# Altium PCB 24V-10A-Power-Board-v1.0.PcbDoc (part 2 of 5)
Units mil, origin at the board's own origin, x right, y up, seen from the top; angles counter-clockwise.
Board outline 6000 x 4000 mil, 2 copper layers (Top Layer, Bottom Layer); 609 components, 307 nets, 1491 pads, 0 vias.
Unrouted connection lines stored in the file: 1132.
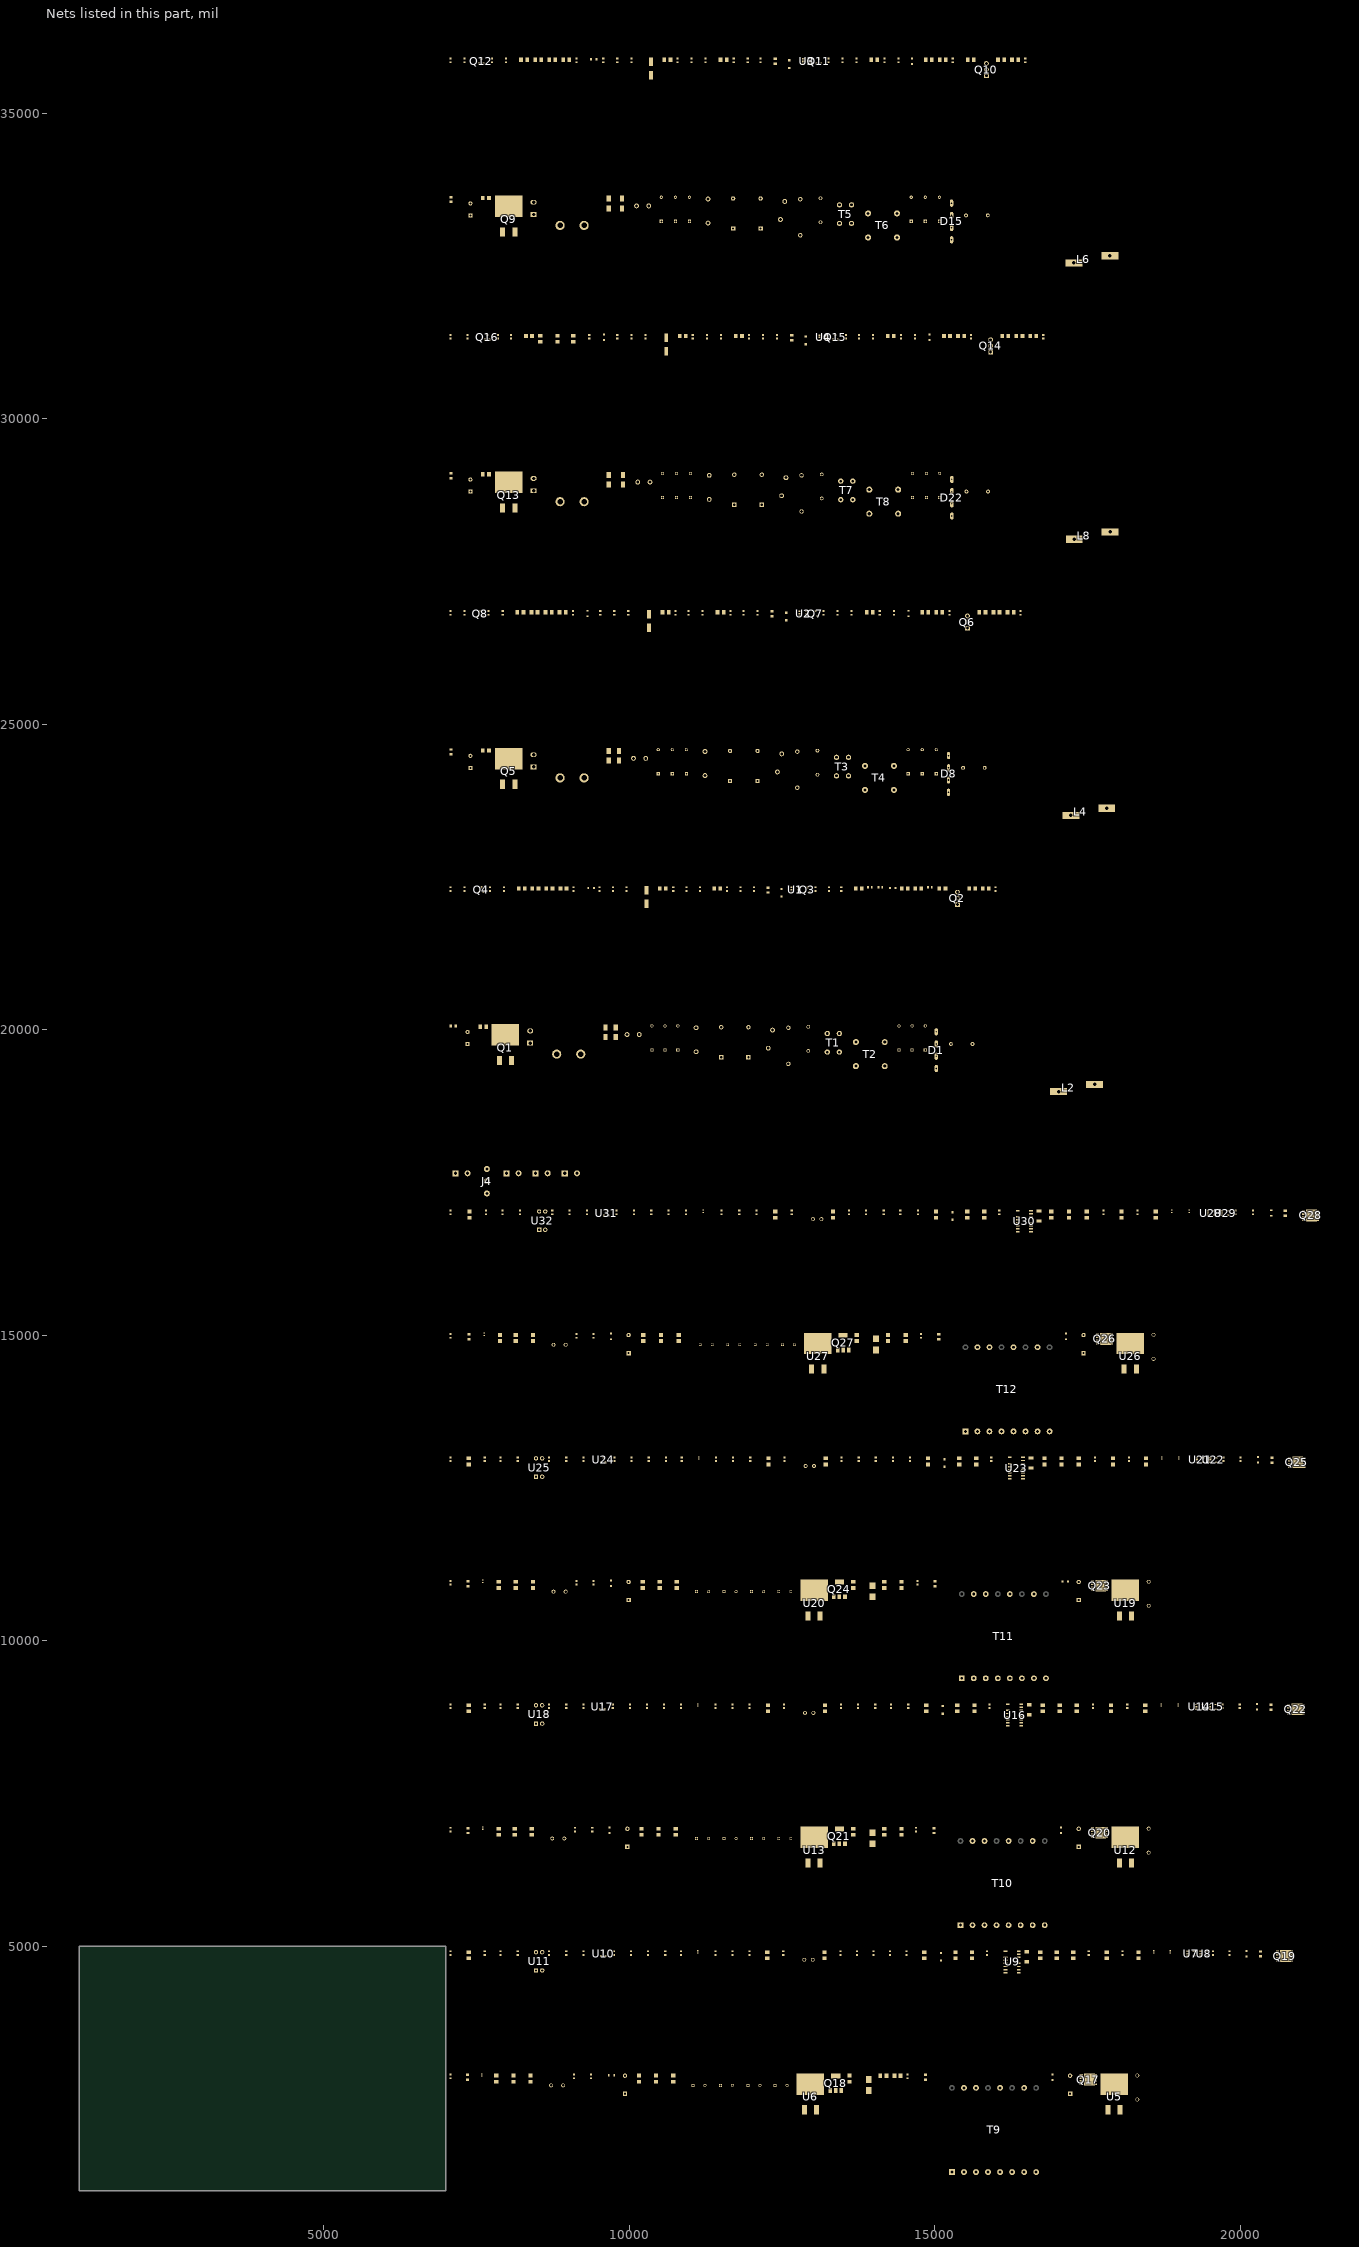
[diagram p2: the nets of this part, all layers, seen from the top]

## Part data (continued)
C15 C38 C61 C84: library part CC0603KRX7R8BB392, "CAP CER 3900PF 25V X7R 0603", Case Code (Imperial)=0603, Case Code (Metric)=1608, Dielectric=X7R, LCSC Part Number=C519424, Manufacturer=Yageo, Max Operating Temperature=125°C, Min Operating Temperature=-55°C, Tolerance=10%, Voltage Rating=25V, Case/Package=0603, ComponentLink1Description=https://datasheet.ciiva.com/13207/upy-gphc-x7r-6-3v-to-50v-8-12304-13207771.pdf?src-supplier=Mouser, ComponentLink1URL=https://datasheet.ciiva.com/13207/upy-gphc-x7r-6-3v-to-50v-8-12304-13207771.pdf?src-supplier=Mouser, Halogen Free="Halogen Free", Height=900um, Item Type=Capacitor, Lead Free="Lead Free", Length=0.063inch, Manufacturer Part Number=CC0603KRX7R8BB392, Material=4241ConductorMaterial, Mounting Technology="Surface Mount", Packaging="Tape and Reel", Pricing="1=0.1, 10=0.061, 50=0.035, 100=0.0271, 500=0.02036, 1000=0.016 (USD)", RoHS=Yes, Series=CC, Stock=46115, Supplier=Digikey, Termination=SMD/SMT, Thickness=0.035inch, Voltage Rating (DC)=25V, Weight=7.1E-05oz, Width=0.031inch
C16 C39 C62 C85: library part 06035A561JAT2A, "CAP CER 560PF 50V C0G/NP0 0603", LCSC Part Number=C597173, Manufacturer="Kyocera AVX", ComponentLink1Description=https://datasheet.ciiva.com/27051/1032160-27051276.pdf?src-supplier=Jameco, ComponentLink1URL=https://datasheet.ciiva.com/27051/1032160-27051276.pdf?src-supplier=Jameco, ComponentLink2Description=https://datasheet.ciiva.com/16286/ccog-16286446.pdf?src-supplier=Future+Electronics, ComponentLink2URL=https://datasheet.ciiva.com/16286/ccog-16286446.pdf?src-supplier=Future+Electronics, ComponentLink3Description=https://datasheet.ciiva.com/150/ccog-150647.pdf?src-supplier=Digikey, ComponentLink3URL=https://datasheet.ciiva.com/150/ccog-150647.pdf?src-supplier=Digikey, ComponentLink4Description=https://datasheet.ciiva.com/150/ccog-150648.pdf?src-supplier=Digikey, ComponentLink4URL=https://datasheet.ciiva.com/150/ccog-150648.pdf?src-supplier=Digikey, ComponentLink5Description=https://datasheet.ciiva.com/150/ccog-150649.pdf?src-supplier=Digikey, ComponentLink5URL=https://datasheet.ciiva.com/150/ccog-150649.pdf?src-supplier=Digikey, ComponentLink6Description=https://datasheet.ciiva.com/2987/ccog-2987809.pdf?src-supplier=Avnet, ComponentLink6URL=https://datasheet.ciiva.com/2987/ccog-2987809.pdf?src-supplier=Avnet, ComponentLink7Description=https://datasheet.ciiva.com/2987/ccog-2987810.pdf?src-supplier=Avnet, ComponentLink7URL=https://datasheet.ciiva.com/2987/ccog-2987810.pdf?src-supplier=Avnet, ComponentLink8Description=https://datasheet.ciiva.com/5423/ccog-5423589.pdf?src-supplier=Mouser, ComponentLink8URL=https://datasheet.ciiva.com/5423/ccog-5423589.pdf?src-supplier=Mouser, ComponentLink9Description=https://datasheet.ciiva.com/14598/70001039-14598549.pdf?src-supplier=Allied+Electronics, ComponentLink9URL=https://datasheet.ciiva.com/14598/70001039-14598549.pdf?src-supplier=Allied+Electronics, ComponentLink10Description=https://datasheet.ciiva.com/1124/425357-1124836.pdf?src-supplier=Element14, ComponentLink10URL=https://datasheet.ciiva.com/1124/425357-1124836.pdf?src-supplier=Element14, ComponentLink11Description=https://datasheet.ciiva.com/1124/425357-1124837.pdf?src-supplier=Element14, ComponentLink11URL=https://datasheet.ciiva.com/1124/425357-1124837.pdf?src-supplier=Element14, Item Type=Capacitor, Manufacturer Part Number=06035A561JAT2A, Pricing="4000=0.0172, 16000=0.0165, 40000=0.0091, 60000=0.0158, 100000=0.0088, 120000=0.0155, 160000=0.0083, 300000=0.0148 (USD)", RoHS=Yes, Stock=180000, Supplier="Future Electronics"
C17 C40 C63 C86: library part 12063C474KAT2A, "CAP CER 0.47UF 25V X7R 1206", LCSC Part Number=C5128353, Manufacturer="Kyocera AVX", ComponentLink1Description=https://datasheet.ciiva.com/11788/0900766b80dc2409-11788602.pdf?src-supplier=Rs, ComponentLink1URL=https://datasheet.ciiva.com/11788/0900766b80dc2409-11788602.pdf?src-supplier=Rs, ComponentLink2Description=https://datasheet.ciiva.com/19476/2014158-19476160.pdf?src-supplier=Jameco, ComponentLink2URL=https://datasheet.ciiva.com/19476/2014158-19476160.pdf?src-supplier=Jameco, ComponentLink3Description=https://datasheet.ciiva.com/14601/70001075-14601957.pdf?src-supplier=Allied+Electronics, ComponentLink3URL=https://datasheet.ciiva.com/14601/70001075-14601957.pdf?src-supplier=Allied+Electronics, ComponentLink4Description=https://datasheet.ciiva.com/28546/683218-28546839.pdf?src-supplier=Element14, ComponentLink4URL=https://datasheet.ciiva.com/28546/683218-28546839.pdf?src-supplier=Element14, ComponentLink5Description=https://datasheet.ciiva.com/7833/84526-7833365.pdf?src-supplier=Element14, ComponentLink5URL=https://datasheet.ciiva.com/7833/84526-7833365.pdf?src-supplier=Element14, ComponentLink6Description=https://datasheet.ciiva.com/16291/cx7r-16291039.pdf?src-supplier=Future+Electronics, ComponentLink6URL=https://datasheet.ciiva.com/16291/cx7r-16291039.pdf?src-supplier=Future+Electronics, ComponentLink7Description=https://datasheet.ciiva.com/152/cx7r-152592.pdf?src-supplier=Digikey, ComponentLink7URL=https://datasheet.ciiva.com/152/cx7r-152592.pdf?src-supplier=Digikey, ComponentLink8Description=https://datasheet.ciiva.com/152/cx7r-152593.pdf?src-supplier=Digikey, ComponentLink8URL=https://datasheet.ciiva.com/152/cx7r-152593.pdf?src-supplier=Digikey, ComponentLink9Description=https://datasheet.ciiva.com/152/cx7r-152594.pdf?src-supplier=Digikey, ComponentLink9URL=https://datasheet.ciiva.com/152/cx7r-152594.pdf?src-supplier=Digikey, Item Type=Capacitor, Manufacturer Part Number=12063C474KAT2A, Pricing="2000=0.0614, 6000=0.0591, 10000=0.0566, 20000=0.0567, 40000=0.0554, 80000=0.053 (USD)", RoHS=Yes, Stock=38000, Supplier="Future Electronics"
C18 C41 C64 C87: library part CC0603KRX7R9BB683, "CAP CER 0.068UF 50V X7R 0603", Case Code (Imperial)=0603, Case Code (Metric)=1608, Dielectric=X7R, LCSC Part Number=C107098, Manufacturer=Yageo, Max Operating Temperature=125°C, Min Operating Temperature=-55°C, Supplier Part Number=3015344, Tolerance=10%, Voltage Rating=50V, Case/Package=0603, ComponentLink1Description=http://www.mouser.com/ds/2/447/Yageo_UPY-GP_NP0_16V-to-50V_9-358835.pdf?src-supplier=Mouser, ComponentLink1URL=http://www.mouser.com/ds/2/447/Yageo_UPY-GP_NP0_16V-to-50V_9-358835.pdf?src-supplier=Mouser, ComponentLink2Description=https://datasheet.octopart.com/CC0603KRX7R9BB683-Yageo-datasheet-166511530.pdf?src-supplier=Future+Electronics, ComponentLink2URL=https://datasheet.octopart.com/CC0603KRX7R9BB683-Yageo-datasheet-166511530.pdf?src-supplier=Future+Electronics, ComponentLink3Description=http://www.yageo.com/documents/recent/UPY-GPHC_X7R_6.3V-to-50V_18.pdf?src-supplier=Digikey, ComponentLink3URL=http://www.yageo.com/documents/recent/UPY-GPHC_X7R_6.3V-to-50V_18.pdf?src-supplier=Digikey, ComponentLink4Description=https://www.yageo.com/upload/media/product/productsearch/datasheet/mlcc/UPY-GPHC_X7R_6.3V-to-50V_18.pdf?src-supplier=Digikey, ComponentLink4URL=https://www.yageo.com/upload/media/product/productsearch/datasheet/mlcc/UPY-GPHC_X7R_6.3V-to-50V_18.pdf?src-supplier=Digikey, ComponentLink5Description=https://datasheet.octopart.com/CC0603KRX7R9BB683-Yageo-datasheet-140260305.pdf?src-supplier=Newark, ComponentLink5URL=https://datasheet.octopart.com/CC0603KRX7R9BB683-Yageo-datasheet-140260305.pdf?src-supplier=Newark, ComponentLink6Description=http://www.yageo.com/documents/recent/UPY-GPHC_X7R_6.3V-to-50V_9.pdf?src-supplier=Future+Electronics, ComponentLink6URL=http://www.yageo.com/documents/recent/UPY-GPHC_X7R_6.3V-to-50V_9.pdf?src-supplier=Future+Electronics, Halogen Free="Halogen Free", Item Type=Capacitors, Lead Free="Lead Free", Length=0.063inch, Manufacturer Part Number=CC0603KRX7R9BB683, Material=4241ConductorMaterial, Mounting Technology="Surface Mount", Packaging="Tape and Reel", Pricing="4000=0.0058, 16000=0.0055, 60000=0.0052, 160000=0.005, 400000=0.0047 (USD)", RoHS=Yes, RoHS Compliant=Yes, Series=CC, Stock=52000, Supplier="Future Electronics", Termination=SMD/SMT, Thickness=0.035inch, Voltage Rating (DC)=50V, Weight=7.1E-05oz, Width=0.031inch
C19 C42 C65 C88: library part CC0603KRX7R7BB224, "CAP CER 0.22UF 16V X7R 0603", Manufacturer=Yageo, Supplier Part Number=311-1426-1-ND, Voltage Rating (DC)=16V, ComponentLink1Description=https://datasheet.ciiva.com/11788/0900766b80d84f1d-11788400.pdf?src-supplier=Rs, ComponentLink1URL=https://datasheet.ciiva.com/11788/0900766b80d84f1d-11788400.pdf?src-supplier=Rs, ComponentLink2Description=https://datasheet.ciiva.com/176/mlccorderingcode-176606.pdf?src-supplier=Digikey, ComponentLink2URL=https://datasheet.ciiva.com/176/mlccorderingcode-176606.pdf?src-supplier=Digikey, ComponentLink3Description=https://datasheet.ciiva.com/176/mlccorderingcode-176607.pdf?src-supplier=Digikey, ComponentLink3URL=https://datasheet.ciiva.com/176/mlccorderingcode-176607.pdf?src-supplier=Digikey, ComponentLink4Description=https://datasheet.ciiva.com/176/mlccorderingcode-176608.pdf?src-supplier=Digikey, ComponentLink4URL=https://datasheet.ciiva.com/176/mlccorderingcode-176608.pdf?src-supplier=Digikey, Halogen Free=5694HalogenFree, Item Type=Capacitor, Lead Free=5697LeadFree, Manufacturer Part Number=CC0603KRX7R7BB224, Material=4241ConductorMaterial, Pricing="1=0.1, 10=0.058, 50=0.0334, 100=0.0258, 500=0.01944, 1000=0.01528 (USD)", RoHS=Yes, Stock=45192, Supplier=Digikey
C20 C43 C66 C89: library part CC1206KKX7R9BB474, "CAP CER 0.47UF 50V X7R 1206", LCSC Part Number=C277483, Manufacturer=Yageo, ComponentLink1Description=https://datasheet.ciiva.com/13210/upy-gp-np0-16v-to-50v-8-13210236.pdf?src-supplier=Mouser, ComponentLink1URL=https://datasheet.ciiva.com/13210/upy-gp-np0-16v-to-50v-8-13210236.pdf?src-supplier=Mouser, ComponentLink2Description=https://datasheet.ciiva.com/181/mlccorderingcode-181013.pdf?src-supplier=Digikey, ComponentLink2URL=https://datasheet.ciiva.com/181/mlccorderingcode-181013.pdf?src-supplier=Digikey, ComponentLink3Description=https://datasheet.ciiva.com/181/mlccorderingcode-181014.pdf?src-supplier=Digikey, ComponentLink3URL=https://datasheet.ciiva.com/181/mlccorderingcode-181014.pdf?src-supplier=Digikey, ComponentLink4Description=https://datasheet.ciiva.com/181/mlccorderingcode-181015.pdf?src-supplier=Digikey, ComponentLink4URL=https://datasheet.ciiva.com/181/mlccorderingcode-181015.pdf?src-supplier=Digikey, Item Type=Capacitor, Manufacturer Part Number=CC1206KKX7R9BB474, Material=4241ConductorMaterial, Pricing="3000=0.0393, 9000=0.0378, 15000=0.0371, 30000=0.0362, 60000=0.0349 (USD)", RoHS=Yes, Stock=36000, Supplier="Future Electronics"
C21 C44 C67 C90: library part 50SVPF10M, "CAP ALUM POLY 10UF 20% 50V SMD", LCSC Part Number=C2162323, Manufacturer=Panasonic, Supplier Part Number=667-50SVPF10M, Category="Polymer Capacitors", ComponentLink1Description=https://datasheet.ciiva.com/48542/svpf-eng-ds-48542427.pdf?src-supplier=Distrelec, ComponentLink1URL=https://datasheet.ciiva.com/48542/svpf-eng-ds-48542427.pdf?src-supplier=Distrelec, ComponentLink2Description=https://datasheet.ciiva.com/24216/svpf-os-262415-24216043.pdf?src-supplier=Mouser, ComponentLink2URL=https://datasheet.ciiva.com/24216/svpf-os-262415-24216043.pdf?src-supplier=Mouser, ComponentLink3Description=https://datasheet.ciiva.com/25761/1734360-25761263.pdf?src-supplier=Farnell, ComponentLink3URL=https://datasheet.ciiva.com/25761/1734360-25761263.pdf?src-supplier=Farnell, Item Type=Capacitor, Manufacturer Part Number=50SVPF10M, Material=4242ConductorMaterial, Pricing="1=1.12, 10=0.801, 50=0.801, 100=0.665, 1000=0.555, 10000=0.504 (USD)", RoHS=Yes, Stock=29802, Supplier=Mouser
C22 C45 C68 C91: "CAP CER 1000PF 100V X7R 0603", LCSC Part Number=C2167292, Manufacturer="Kyocera AVX", ComponentLink1Description=https://datasheet.ciiva.com/5422/cx7r-218113-5422905.pdf?src-supplier=Mouser, ComponentLink1URL=https://datasheet.ciiva.com/5422/cx7r-218113-5422905.pdf?src-supplier=Mouser, ComponentLink2Description=https://datasheet.ciiva.com/11499/cx7r-11499669.pdf?src-supplier=Avnet, ComponentLink2URL=https://datasheet.ciiva.com/11499/cx7r-11499669.pdf?src-supplier=Avnet, ComponentLink3Description=https://datasheet.ciiva.com/2987/cx7r-2987733.pdf?src-supplier=Avnet, ComponentLink3URL=https://datasheet.ciiva.com/2987/cx7r-2987733.pdf?src-supplier=Avnet, ComponentLink4Description=https://datasheet.ciiva.com/150/cx7r-150395.pdf?src-supplier=Digikey, ComponentLink4URL=https://datasheet.ciiva.com/150/cx7r-150395.pdf?src-supplier=Digikey, ComponentLink5Description=https://datasheet.ciiva.com/150/cx7r-150396.pdf?src-supplier=Digikey, ComponentLink5URL=https://datasheet.ciiva.com/150/cx7r-150396.pdf?src-supplier=Digikey, ComponentLink6Description=https://datasheet.ciiva.com/150/cx7r-150397.pdf?src-supplier=Digikey, ComponentLink6URL=https://datasheet.ciiva.com/150/cx7r-150397.pdf?src-supplier=Digikey, ComponentLink7Description=https://datasheet.ciiva.com/1124/1679506-1124198.pdf?src-supplier=Element14, ComponentLink7URL=https://datasheet.ciiva.com/1124/1679506-1124198.pdf?src-supplier=Element14, ComponentLink8Description=https://datasheet.ciiva.com/22693/1679506-22693579.pdf?src-supplier=Element14, ComponentLink8URL=https://datasheet.ciiva.com/22693/1679506-22693579.pdf?src-supplier=Element14, ComponentLink9Description=https://datasheet.ciiva.com/7855/1679506-7855033.pdf?src-supplier=Element14, ComponentLink9URL=https://datasheet.ciiva.com/7855/1679506-7855033.pdf?src-supplier=Element14, ComponentLink10Description=https://datasheet.ciiva.com/7855/84526-7855189.pdf?src-supplier=Element14, ComponentLink10URL=https://datasheet.ciiva.com/7855/84526-7855189.pdf?src-supplier=Element14, ComponentLink11Description=https://datasheet.ciiva.com/16289/cx7r-16289400.pdf?src-supplier=Future+Electronics, ComponentLink11URL=https://datasheet.ciiva.com/16289/cx7r-16289400.pdf?src-supplier=Future+Electronics, ComponentLink12Description=https://datasheet.ciiva.com/14594/70001075-14594623.pdf?src-supplier=Allied+Electronics, ComponentLink12URL=https://datasheet.ciiva.com/14594/70001075-14594623.pdf?src-supplier=Allied+Electronics, ComponentLink13Description=https://datasheet.ciiva.com/14600/70001075-14600988.pdf?src-supplier=Allied+Electronics, ComponentLink13URL=https://datasheet.ciiva.com/14600/70001075-14600988.pdf?src-supplier=Allied+Electronics, Item Type=Capacitor, Lead Free=5697LeadFree, Manufacturer Part Number=06031C102KAT2A, Pricing="4000=0.0086, 8000=0.0084, 16000=0.0082, 24000=0.008, 32000=0.0079 (USD)", RoHS=Yes, Stock=656000, Supplier=Avnet
C23 C46 C69 C92: library part 06035A100JAT2A, "CAP CER 10PF 50V C0G/NP0 0603", Case/Package=0603, Dielectric=C0G, Insulation Resistance=100GR, LCSC Part Number=C79547, Manufacturer="Kyocera AVX", Manufacturer Part Number=06035A100JAT2A/4K, Max Operating Temperature=125°C, Min Operating Temperature=-55°C, Supplier Part Number 1=478-1163-1-ND, Temperature Coefficient=30ppm/°C, Tolerance=5%, Voltage=50V, Capacitance=10pF, Depth=0.81mm, Height=0.9mm, Item Type=Capacitor, Lead Free="Lead Free", Length=1.6mm, Mount="Surface Mount", Number of Pins=2, Packaging="Cut Tape", Pricing 1="1=0.1, 10=0.05, 50=0.0272, 100=0.0222, 500=0.01586, 1000=0.01246 (USD)", REACH SVHC="No SVHC", Stock 1=196463, Supplier 1=Digi-Key, Thickness=864um, Voltage Rating (DC)=50V, Width=810um
C93 C128 C163 C198: library part DE1E3RA222MA4BN01F, "2200 pF ±20% 250VAC Ceramic Capacitor E Radial, Disc", LCSC Part Number=C343981, Manufacturer=Murata, ComponentLink1Description=http://www.farnell.com/datasheets/2608335.pdf?src-supplier=Farnell, ComponentLink1URL=http://www.farnell.com/datasheets/2608335.pdf?src-supplier=Farnell, ComponentLink2Description=http://www.farnell.com/datasheets/2608335.pdf?src-supplier=Newark, ComponentLink2URL=http://www.farnell.com/datasheets/2608335.pdf?src-supplier=Newark, ComponentLink3Description=https://datasheet.octopart.com/DE1E3RA222MA4BN01F-Murata-datasheet-166166226.pdf?src-supplier=TME, ComponentLink3URL=https://datasheet.octopart.com/DE1E3RA222MA4BN01F-Murata-datasheet-166166226.pdf?src-supplier=TME, Item Type=Capacitors, Manufacturer Part Number=DE1E3RA222MA4BN01F, Pricing="1=0.42, 10=0.271, 50=0.271, 100=0.146, 1000=0.114, 10000=0.097 (USD)", RoHS=Yes, Stock=37677, Supplier=Mouser
C94 C102 C129 C137 C164 C172 C199 C207: "22nF -40℃~+100℃ ±5% 630V Plugin,P=7.5mm Polypropylene Film Capacitors (CBB) ROHS", LCSC Part Number=C390073, Manufacturer=KYET, Package=Plugin,P=7.5mm, ComponentLink1Description=LCSC, ComponentLink1URL=https://www.lcsc.com/product-detail/Polypropylene-Film-Capacitors-CBB_KYET-KP223J2J0701_C390073.html, Item Type=Capacitor, Manufacturer Part Number=KP223J2J0701
C95 C96 C107 C108 C130 C131 C142 C143 C165 C166 C177 C178 C200 C201 C212 C213: library part UMK316AB7475KL-T, "CAP CER 4.7UF 50V X7R 1206", Case Code (Imperial)=1206, Case Code (Metric)=3216, Dielectric=X7R, LCSC Part Number=C92853, Manufacturer="Taiyo Yuden", Max Operating Temperature=125°C, Min Operating Temperature=-55°C, Package Quantity=2000, Tolerance=10%, Voltage Rating=50V, Case/Package=1206, ComponentLink1Description=https://datasheet.ciiva.com/170/umk316ab7475kl-t-ss-170928.pdf?src-supplier=Digikey, ComponentLink1URL=https://datasheet.ciiva.com/170/umk316ab7475kl-t-ss-170928.pdf?src-supplier=Digikey, ComponentLink2Description=https://datasheet.ciiva.com/2990/umk316ab7475kl-t-ss-2990070.pdf?src-supplier=Avnet, ComponentLink2URL=https://datasheet.ciiva.com/2990/umk316ab7475kl-t-ss-2990070.pdf?src-supplier=Avnet, ComponentLink3Description=https://datasheet.ciiva.com/15922/1010umk316ab7475kl-t-15922628.pdf?src-supplier=Onlinecomponents.com, ComponentLink3URL=https://datasheet.ciiva.com/15922/1010umk316ab7475kl-t-15922628.pdf?src-supplier=Onlinecomponents.com, ComponentLink4Description=https://datasheet.ciiva.com/7975/1481447-7975911.pdf?src-supplier=Element14, ComponentLink4URL=https://datasheet.ciiva.com/7975/1481447-7975911.pdf?src-supplier=Element14, ComponentLink5Description=https://datasheet.ciiva.com/5413/mlcc-all-e-541559-5413006.pdf?src-supplier=Mouser, ComponentLink5URL=https://datasheet.ciiva.com/5413/mlcc-all-e-541559-5413006.pdf?src-supplier=Mouser, Construction=Flat, Depth=1.6mm, Height=1.6mm, Item Type=Capacitor, Length=3.2mm, Manufacturer Part Number=UMK316AB7475KL-T, Mounting Technology="Surface Mount", Packaging="Tape and Reel", Pins=2, Pricing="1=0.3, 10=0.198, 50=0.146, 100=0.1189, 500=0.09386, 1000=0.07925 (USD)", Radiation Hardening=No, Reach SVHC Compliant=Unknown, RoHS=Yes, RoHS Compliant=Yes, Series=M, Stock=392550, Supplier=Digikey, Termination=SMD/SMT, Voltage Rating (DC)=50V, Width=1.6mm
C97 C98 C99 C100 C132 C133 C134 C135 C167 C168 C169 C170 C202 C203 C204 C205: library part EEU-FR1V681B, "CAP ALUM 680UF 20% 35V RADIAL TH", Case/Package=Radial, ESR (Equivalent Series Resistance)=20mR, LCSC Part Number=C178718, Manufacturer=Panasonic, Max Operating Temperature=105°C, Min Operating Temperature=-40°C, Package Quantity=500, Ripple Current=2.18A, Tolerance=20%, Voltage Rating=35V, ComponentLink1Description=https://datasheet.ciiva.com/11677/aba0000ce132-11677705.pdf?src-supplier=Avnet, ComponentLink1URL=https://datasheet.ciiva.com/11677/aba0000ce132-11677705.pdf?src-supplier=Avnet, ComponentLink2Description=https://datasheet.ciiva.com/15941/aba0000ce132-15941222.pdf?src-supplier=Onlinecomponents.com, ComponentLink2URL=https://datasheet.ciiva.com/15941/aba0000ce132-15941222.pdf?src-supplier=Onlinecomponents.com, ComponentLink3Description=https://datasheet.ciiva.com/43469/1653413-43469593.pdf?src-supplier=Farnell, ComponentLink3URL=https://datasheet.ciiva.com/43469/1653413-43469593.pdf?src-supplier=Farnell, ComponentLink4Description=https://datasheet.ciiva.com/46371/1653413-46371786.pdf?src-supplier=Element14, ComponentLink4URL=https://datasheet.ciiva.com/46371/1653413-46371786.pdf?src-supplier=Element14, ComponentLink5Description=https://datasheet.ciiva.com/29248/448590-da-01-en-alu-kondensator-fr-r-680-uf-35v-500st-29248054.pdf?src-supplier=Conrad, ComponentLink5URL=https://datasheet.ciiva.com/29248/448590-da-01-en-alu-kondensator-fr-r-680-uf-35v-500st-29248054.pdf?src-supplier=Conrad, Diameter=10mm, Features="General Purpose", Height=20mm, Height - Seated (Max)=0.866inch, Impedance=20mR, Item Type=Capacitor, Lead Diameter=0.6mm, Lead Pitch=5mm, Lead/Base Style=Straight, Length=20mm, Life (Hours)=10000Hour, Manufacturer Part Number=EEU-FR1V681B, Mounting Technology="Through Hole", Packaging="Tape and Reel", Pricing="1=0.93, 10=0.674, 50=0.5894, 100=0.4803 (USD)", Radiation Hardening=No, Reach SVHC Compliant=Yes, RoHS=Yes, RoHS Compliant=Yes, Series=FR, Stock=566, Supplier=Digikey, Termination=Radial, Voltage Rating (DC)=35V
C101 C110 C112 C136 C145 C147 C171 C180 C182 C206 C215 C217: library part CC1206KRX7R9BB104, "CAP CER 0.1UF 50V X7R 1206", Case Code (Imperial)=1206, Case Code (Metric)=3216, Dielectric=X7R, Insulation Resistance=100GR, LCSC Part Number=311-1179-1-ND, Manufacturer=Yageo, Max Operating Temperature=125°C, Min Operating Temperature=-55°C, Tolerance=10%, Voltage=50V, Case/Package=1206, ComponentLink1Description=https://datasheet.ciiva.com/11786/0900766b80d84f1d-11786968.pdf?src-supplier=Rs, ComponentLink1URL=https://datasheet.ciiva.com/11786/0900766b80d84f1d-11786968.pdf?src-supplier=Rs, ComponentLink2Description=https://datasheet.ciiva.com/7978/1489800-7978230.pdf?src-supplier=Element14, ComponentLink2URL=https://datasheet.ciiva.com/7978/1489800-7978230.pdf?src-supplier=Element14, ComponentLink3Description=https://datasheet.ciiva.com/28450/1489800-28450892.pdf?src-supplier=Element14, ComponentLink3URL=https://datasheet.ciiva.com/28450/1489800-28450892.pdf?src-supplier=Element14, ComponentLink4Description=https://datasheet.ciiva.com/144/mlccorderingcode-144906.pdf?src-supplier=Digikey, ComponentLink4URL=https://datasheet.ciiva.com/144/mlccorderingcode-144906.pdf?src-supplier=Digikey, ComponentLink5Description=https://datasheet.ciiva.com/144/mlccorderingcode-144905.pdf?src-supplier=Digikey, ComponentLink5URL=https://datasheet.ciiva.com/144/mlccorderingcode-144905.pdf?src-supplier=Digikey, ComponentLink6Description=https://datasheet.ciiva.com/144/mlccorderingcode-144907.pdf?src-supplier=Digikey, ComponentLink6URL=https://datasheet.ciiva.com/144/mlccorderingcode-144907.pdf?src-supplier=Digikey, ComponentLink7Description=https://datasheet.ciiva.com/5425/upy-gp-np0-16v-to-50v-8-3714-5425561.pdf?src-supplier=Mouser, ComponentLink7URL=https://datasheet.ciiva.com/5425/upy-gp-np0-16v-to-50v-8-3714-5425561.pdf?src-supplier=Mouser, ComponentLink8Description=https://datasheet.ciiva.com/28363/1734573-28363672.pdf?src-supplier=Element14, ComponentLink8URL=https://datasheet.ciiva.com/28363/1734573-28363672.pdf?src-supplier=Element14, ComponentLink9Description=https://datasheet.ciiva.com/46385/1734573-46385063.pdf?src-supplier=Element14, ComponentLink9URL=https://datasheet.ciiva.com/46385/1734573-46385063.pdf?src-supplier=Element14, ComponentLink10Description=https://datasheet.ciiva.com/15189/getdatasheetpartid-251811-15189275.pdf?src-supplier=Verical, ComponentLink10URL=https://datasheet.ciiva.com/15189/getdatasheetpartid-251811-15189275.pdf?src-supplier=Verical, Depth=1.6mm, Halogen Free=5694HalogenFree, Height=0.85mm, Item Type=Capacitor, Lead Free=5697LeadFree, Length=3.2mm, Manufacturer Part Number=CC1206KRX7R9BB104, Material=Ceramic, Mounting Technology="Surface Mount", Packaging="Tape and Reel", Pins=2, Pricing="1=0.19, 10=0.128, 50=0.0764, 100=0.0601, 500=0.04436, 1000=0.03672 (USD)", Radiation Hardening=No, Reach SVHC Compliant=Unknown, RoHS=Yes, RoHS Compliant=Yes, Series=CC, Stock=520624, Supplier=Digikey, Termination=SMD/SMT, Voltage Rating=50V, Voltage Rating (DC)=50V
C103 C138 C173 C208: library part GRM31A5C2J151JW01D, "CAP CER 150PF 630V C0G/NP0 1206", LCSC Part Number=C162445, Manufacturer=Murata, ComponentLink1Description=https://datasheet.ciiva.com/138/partnumbering-e-01-138796.pdf?src-supplier=Digikey, ComponentLink1URL=https://datasheet.ciiva.com/138/partnumbering-e-01-138796.pdf?src-supplier=Digikey, ComponentLink2Description=https://datasheet.ciiva.com/138/partnumbering-e-01-138797.pdf?src-supplier=Digikey, ComponentLink2URL=https://datasheet.ciiva.com/138/partnumbering-e-01-138797.pdf?src-supplier=Digikey, ComponentLink3Description=https://datasheet.ciiva.com/138/partnumbering-e-01-138798.pdf?src-supplier=Digikey, ComponentLink3URL=https://datasheet.ciiva.com/138/partnumbering-e-01-138798.pdf?src-supplier=Digikey, ComponentLink4Description=https://datasheet.ciiva.com/13240/c02e-2905-13240518.pdf?src-supplier=Mouser, ComponentLink4URL=https://datasheet.ciiva.com/13240/c02e-2905-13240518.pdf?src-supplier=Mouser, Item Type=Capacitor, Manufacturer Part Number=GRM31A5C2J151JW01D, Pricing="1=0.35, 10=0.194, 50=0.194, 100=0.12, 1000=0.1, 10000=0.08 (USD)", RoHS=Yes, Stock=4361, Supplier=Mouser
C104 C139 C174 C209: library part GRM31A5C3A101JW01D, "CAP CER 100PF 1KV 5% NP0 1206", LCSC Part Number=C162451, Manufacturer=Murata, ComponentLink1Description=https://datasheet.ciiva.com/29535/partnumbering-e-01-29535608.pdf?src-supplier=Digikey, ComponentLink1URL=https://datasheet.ciiva.com/29535/partnumbering-e-01-29535608.pdf?src-supplier=Digikey, ComponentLink2Description=https://datasheet.ciiva.com/7829/1666664-7829029.pdf?src-supplier=Element14, ComponentLink2URL=https://datasheet.ciiva.com/7829/1666664-7829029.pdf?src-supplier=Element14, Item Type=Capacitor, Manufacturer Part Number=GRM31A5C3A101JW01D, Pricing="4000=0.0742, 8000=0.0723, 12000=0.0712, 16000=0.0704, 20000=0.068 (USD)", RoHS=Yes, Stock=4000, Supplier="Future Electronics"
C105 C140 C175 C210: library part EEU-FR1V471B, "CAP ALUM 470UF 20% 35V RADIAL", LCSC Part Number=C713403, Leakage Current=164.5uA, Manufacturer=Panasonic, ComponentLink1Description=https://datasheet.ciiva.com/43469/1653413-43469590.pdf?src-supplier=Farnell, ComponentLink1URL=https://datasheet.ciiva.com/43469/1653413-43469590.pdf?src-supplier=Farnell, ComponentLink2Description=https://datasheet.ciiva.com/11678/aba0000ce132-11678063.pdf?src-supplier=Avnet, ComponentLink2URL=https://datasheet.ciiva.com/11678/aba0000ce132-11678063.pdf?src-supplier=Avnet, ComponentLink3Description=https://datasheet.ciiva.com/46371/1653413-46371772.pdf?src-supplier=Element14, ComponentLink3URL=https://datasheet.ciiva.com/46371/1653413-46371772.pdf?src-supplier=Element14, ComponentLink4Description=https://datasheet.ciiva.com/7805/1725490-7805503.pdf?src-supplier=Element14, ComponentLink4URL=https://datasheet.ciiva.com/7805/1725490-7805503.pdf?src-supplier=Element14, ComponentLink5Description=https://datasheet.ciiva.com/30252/9aba0000ce132-30252342.pdf?src-supplier=Onlinecomponents.com, ComponentLink5URL=https://datasheet.ciiva.com/30252/9aba0000ce132-30252342.pdf?src-supplier=Onlinecomponents.com, ComponentLink6Description=https://datasheet.ciiva.com/16387/aba0000ce132-16387061.pdf?src-supplier=Future+Electronics, ComponentLink6URL=https://datasheet.ciiva.com/16387/aba0000ce132-16387061.pdf?src-supplier=Future+Electronics, ComponentLink7Description=https://datasheet.ciiva.com/14602/70257620-14602201.pdf?src-supplier=Allied+Electronics, ComponentLink7URL=https://datasheet.ciiva.com/14602/70257620-14602201.pdf?src-supplier=Allied+Electronics, ComponentLink8Description=https://datasheet.ciiva.com/29247/448536-da-01-en-alu-kondensator-fr-r-470-uf-35v-500st-29247995.pdf?src-supplier=Conrad, ComponentLink8URL=https://datasheet.ciiva.com/29247/448536-da-01-en-alu-kondensator-fr-r-470-uf-35v-500st-29247995.pdf?src-supplier=Conrad, Item Type=Capacitor, Lead Free=5697LeadFree, Manufacturer Part Number=EEU-FR1V471B, Pins=2NUMBER, Pricing="1=0.78, 10=0.461, 50=0.461, 100=0.375, 1000=0.263, 10000=0.23 (USD)", RoHS=Yes, Stock=21799, Supplier=Mouser
C106 C141 C176 C211: library part CC1206KKX5R9BB225, "CAP CER 2.2UF 50V X5R 1206", Case Code (Imperial)=1206, Case Code (Metric)=3216, Dielectric=X5R, LCSC Part Number=C577210, Manufacturer=Yageo, Max Operating Temperature=85°C, Min Operating Temperature=-55°C, Package Quantity=2000, Tolerance=10%, Voltage Rating=50V, Case/Package=1206, ComponentLink1Description=http://www.mouser.com/ds/2/447/Yageo_UPY-GP_NP0_16V-to-50V_9-358835.pdf?src-supplier=Mouser, ComponentLink1URL=http://www.mouser.com/ds/2/447/Yageo_UPY-GP_NP0_16V-to-50V_9-358835.pdf?src-supplier=Mouser, ComponentLink2Description=http://www.yageo.com/documents/recent/UPY-GPHC_X5R_4V-to-50V_25.pdf?src-supplier=Digikey, ComponentLink2URL=http://www.yageo.com/documents/recent/UPY-GPHC_X5R_4V-to-50V_25.pdf?src-supplier=Digikey, Halogen Free="Halogen Free", Height=1.45mm, Item Type=Capacitor, Lead Free="Lead Free", Length=0.126inch, Manufacturer Part Number=CC1206KKX5R9BB225, Material=4241ConductorMaterial, Mounting Technology="Surface Mount", Packaging="Tape and Reel", Pricing="1=0.59, 10=0.395, 50=0.3144, 100=0.2597, 500=0.20286, 1000=0.17244 (USD)", RoHS=Yes, RoHS Compliant=Yes, Series=CC, Stock=4588, Supplier=Digikey, Termination=SMD/SMT, Thickness=0.071inch, Voltage Rating (DC)=50V, Weight=0.000571oz, Width=0.063inch
C109 C111 C144 C146 C179 C181 C214 C216: library part CC0603KRX5R8BB225, "CAP CER 2.2UF 25V X5R 0603", Case Code (Imperial)=0603, Case Code (Metric)=1608, Dielectric=X5R, LCSC Part Number=C309478, Manufacturer=Yageo, Max Operating Temperature=85°C, Min Operating Temperature=-55°C, Package Quantity=4000, Resistor Type=Ceramic, Supplier Part Number 1=311-1786-1-ND, Tolerance=10%, Voltage Rating=25V, Capacitance=2.2uF, Case/Package=0603, ComponentLink1Description=https://www.verical.com/server-webapp/html/getDatasheet?partID=782757&src-supplier=Verical, ComponentLink1URL=https://www.verical.com/server-webapp/html/getDatasheet?partID=782757&src-supplier=Verical, Depth=0.8mm, Halogen Free="Halogen Free", Item Type=Capacitor, Lead Free="Lead Free", Length=1.6mm, Manufacturer Part Number=CC0603KRX5R8BB225, Mount="Surface Mount", Packaging="Tape and Reel", Pricing 1="1=0.4, 10=0.276, 50=0.1932, 100=0.1656, 500=0.1242, 1000=0.10488 (USD)", Radiation Hardening=No, RoHS Compliant=Yes, Stock 1=687936, Supplier 1=Digi-Key, Termination=SMD/SMT, Thickness=0.037inch, Voltage Rating (DC)=25V, Weight=7.1E-05oz, Width=0.031inch
C113 C148 C183 C218: library part CC1206KKX7R7BB225, "CAP CER 2.2UF 16V X7R 1206", LCSC Part Number=C107183, Manufacturer=Yageo, ComponentLink1Description=https://datasheet.ciiva.com/11788/0900766b80d84f1d-11788402.pdf?src-supplier=Rs, ComponentLink1URL=https://datasheet.ciiva.com/11788/0900766b80d84f1d-11788402.pdf?src-supplier=Rs, ComponentLink2Description=https://datasheet.ciiva.com/11466/upy-gphc-x7r-6-3v-to-50v-8-11466572.pdf?src-supplier=Avnet, ComponentLink2URL=https://datasheet.ciiva.com/11466/upy-gphc-x7r-6-3v-to-50v-8-11466572.pdf?src-supplier=Avnet, ComponentLink3Description=https://datasheet.ciiva.com/5425/upy-gphc-x7r-6-3v-to-50v-8-12304-5425499.pdf?src-supplier=Mouser, ComponentLink3URL=https://datasheet.ciiva.com/5425/upy-gphc-x7r-6-3v-to-50v-8-12304-5425499.pdf?src-supplier=Mouser, Item Type=Capacitors, Manufacturer Part Number=CC1206KKX7R7BB225, Material=4241ConductorMaterial, Pricing="1=0.22, 10=0.144, 50=0.1012, 100=0.0817, 500=0.06072, 1000=0.05312 (USD)", RoHS=Yes, Stock=202610, Supplier=Digikey
C114 C115 C116 C149 C150 C151 C184 C185 C186 C219 C220 C221: library part CC0603KRX5R7BB475, "CAP CER 4.7UF 16V X5R 0603", Case Code (Imperial)=0603, Case Code (Metric)=1608, Dielectric=X5R, LCSC Part Number=C277476, Manufacturer=Yageo, Max Operating Temperature=85°C, Min Operating Temperature=-55°C, Resistor Type=Ceramic, Supplier Part Number 1=311-1785-1-ND, Tolerance=10%, Voltage Rating=16V, Capacitance=4.7uF, Case/Package=0603, Category="Ceramic Capacitors", ComponentLink1Description=http://www.mouser.com/ds/2/447/UPY-GPHC_X5R_4V-to-50V_25-1131599.pdf?src-supplier=Mouser, ComponentLink1URL=http://www.mouser.com/ds/2/447/UPY-GPHC_X5R_4V-to-50V_25-1131599.pdf?src-supplier=Mouser, ComponentLink2Description=http://www.yageo.com/documents/recent/UPY-GPHC_X5R_4V-to-50V_25.pdf?src-supplier=Digi-Key, ComponentLink2URL=http://www.yageo.com/documents/recent/UPY-GPHC_X5R_4V-to-50V_25.pdf?src-supplier=Digi-Key, Depth=0.8mm, Halogen Free="Halogen Free", Height=0.8mm, Item Type=Capacitor, Lead Free="Lead Free", Length=1.6mm, Manufacturer Part Number=CC0603KRX5R7BB475, Mount="Surface Mount", Packaging="Tape and Reel", Pricing 1="1=0.20000, 10=0.13800, 50=0.08280, 100=0.06990, 500=0.04784, 1000=0.04233 (USD)", RoHS=Yes, RoHS Compliant=Yes, Series=CC, Stock 1=547703, Supplier 1=Digi-Key, Termination=SMD/SMT, Thickness=0.037inch, Voltage Rating (DC)=16V, Weight=7.1E-05oz, Width=0.8mm
C117 C152 C187 C222: library part GRM1885C1H103JA01D, "CAP CER 10000PF 50V C0G/NP0 0603", Capacitance=10nF, Case Code (Imperial)=0603, Case Code (Metric)=1608, Dielectric=C0G, Manufacturer=Murata, Max Operating Temperature=125°C, Min Operating Temperature=-55°C, Package Quantity=4000, Supplier Part Number 1=1449032, Tolerance=5%, Voltage=50V, Case/Package=0603, Category="Ceramic Capacitors", ComponentLink1Description=https://datasheet.ciiva.com/41860/partnumbering-e-01-41860759.pdf?src-supplier=Digi-Key, ComponentLink1URL=https://datasheet.ciiva.com/41860/partnumbering-e-01-41860759.pdf?src-supplier=Digi-Key, ComponentLink2Description=https://datasheet.ciiva.com/29537/partnumbering-e-01-29537910.pdf?src-supplier=Digi-Key, ComponentLink2URL=https://datasheet.ciiva.com/29537/partnumbering-e-01-29537910.pdf?src-supplier=Digi-Key, Depth=0.8mm, Height=0.8mm, Lead Free="Lead Free", Lead Pitch=0.5mm, Length=1.6mm, Manufacturer Part Number=GRM1885C1H103JA01D, Material=Ceramic, Mount="Surface Mount", Packaging="Tape and Reel", Pricing 1="4000=0.03500, 8000=0.03200 (GBP)", REACH SVHC="No SVHC", RoHS=Yes, RoHS Compliant=Yes, Series=GRM, Stock 1=80000, Supplier 1=RSComponents, Termination=SMD/SMT, Thickness=0.035inch, Voltage Rating=50V, Voltage Rating (DC)=50V, Width=0.8mm
C118 C153 C188 C223: library part RC035M331LO8*14TH-2A1E, "330uF 35V ±20% 860mA@100kHz Plugin,D8xL14mm Aluminum Electrolytic Capacitors - Leaded ROHS", LCSC Part Number=C357626, Manufacturer="BERYL Electronic Tech", Package=Plugin,D8xL14mm, ComponentLink1Description=LCSC, ComponentLink1URL=https://www.lcsc.com/product-detail/Aluminum-Electrolytic-Capacitors-Leaded_BERYL-Electronic-Tech-RC035M331LO8-14TH-2A1E_C357626.html, Item Type=Capacitor, Manufacturer Part Number=RC035M331LO8*14TH-2A1E
C119 C154 C189 C224: library part GRM188R6YA225KA12D, "CAP, 2.2µF, 35V, 10%, X5R, 0603", Case Code (Imperial)=0603, Case Code (Metric)=1608, Dielectric=X5R, LCSC Part Number=C86017, Manufacturer=Murata, Max Operating Temperature=85°C, Min Operating Temperature=-55°C, Package Quantity=4000, Supplier Part Number 1=490-7204-1-ND, Tolerance=10%, Voltage=35V, Capacitance=2.2uF, Case/Package=0603, Category="Ceramic Capacitors", ComponentLink1Description=https://datasheet.ciiva.com/14906/partnumbering-e-01-14906490.pdf?src-supplier=Digi-Key, ComponentLink1URL=https://datasheet.ciiva.com/14906/partnumbering-e-01-14906490.pdf?src-supplier=Digi-Key, ComponentLink2Description=https://datasheet.ciiva.com/14906/partnumbering-e-01-14906491.pdf?src-supplier=Digi-Key, ComponentLink2URL=https://datasheet.ciiva.com/14906/partnumbering-e-01-14906491.pdf?src-supplier=Digi-Key, ComponentLink3Description=https://datasheet.ciiva.com/14906/partnumbering-e-01-14906492.pdf?src-supplier=Digi-Key, ComponentLink3URL=https://datasheet.ciiva.com/14906/partnumbering-e-01-14906492.pdf?src-supplier=Digi-Key, Depth=0.8mm, Height=0.8mm, Item Type=Capacitor, Lead Free="Lead Free", Length=1.6mm, Manufacturer Part Number=GRM188R6YA225KA12D, Material=Ceramic, Mount="Surface Mount", Packaging="Tape and Reel", Pricing 1="1=0.21000, 10=0.14100, 50=0.08480, 100=0.07170, 500=0.04904, 1000=0.04338 (USD)", REACH SVHC="No SVHC", RoHS=Yes, RoHS Compliant=Yes, Series=GRM, Stock 1=81665, Supplier 1=Digi-Key, Termination=SMD/SMT, Thickness=0.035inch, Voltage Rating=35V, Voltage Rating (DC)=35V, Weight=0.000222oz, Width=0.8mm
C120 C155 C190 C225: library part GRM31CR72A105KA01K, "CAP CER 1UF 100V X7R 1206", Case Code (Imperial)=1206, Case Code (Metric)=3216, Dielectric=X7R, LCSC Part Number=C909823, Manufacturer=Murata, Max Operating Temperature=125°C, Min Operating Temperature=-55°C, Package Quantity=1, Supplier Part Number 1=490-6523-1-ND, Tolerance=10%, Voltage Rating=100V, Capacitance=1uF, Case/Package=1206, Category="Ceramic Capacitors", ComponentLink1Description=https://datasheet.ciiva.com/11616/product-11616604.pdf?src-supplier=Avnet, ComponentLink1URL=https://datasheet.ciiva.com/11616/product-11616604.pdf?src-supplier=Avnet, ComponentLink2Description=https://datasheet.ciiva.com/6264/partnumbering-e-01-6264397.pdf?src-supplier=Digi-Key, ComponentLink2URL=https://datasheet.ciiva.com/6264/partnumbering-e-01-6264397.pdf?src-supplier=Digi-Key, ComponentLink3Description=https://datasheet.ciiva.com/6264/partnumbering-e-01-6264398.pdf?src-supplier=Digi-Key, ComponentLink3URL=https://datasheet.ciiva.com/6264/partnumbering-e-01-6264398.pdf?src-supplier=Digi-Key, ComponentLink4Description=https://datasheet.ciiva.com/6264/partnumbering-e-01-6264399.pdf?src-supplier=Digi-Key, ComponentLink4URL=https://datasheet.ciiva.com/6264/partnumbering-e-01-6264399.pdf?src-supplier=Digi-Key, Construction=Flat, Depth=1.6mm, Height=1.6mm, Length=3.2mm, Manufacturer Part Number=GRM31CR72A105KA01K, Mount="Surface Mount", Packaging="Tape and Reel", Pricing 1="1=0.48000, 10=0.33000, 50=0.23100, 100=0.19800, 500=0.14850, 1000=0.12540, 2500=0.11880 (USD)", Radiation Hardening=No, RoHS=Yes, RoHS Compliant=Yes, Series=GRM, Stock 1=11842, Supplier 1=Digi-Key, Termination=SMD/SMT, Thickness=0.071inch, Voltage Rating (DC)=100V, Width=1.6mm
C121 C156 C191 C226: library part CS1608X7R221K500NRB, "50V 220pF X7R ±10% 0603 Multilayer Ceramic Capacitors MLCC - SMD/SMT ROHS", LCSC Part Number=C5255295, Manufacturer="Samwha Capacitors", Package=0603, ComponentLink1Description=LCSC, ComponentLink1URL=https://www.lcsc.com/product-detail/Multilayer-Ceramic-Capacitors-MLCC-SMD-SMT_Samwha-Capacitor-CS1608X7R221K500NRB_C5255295.html, Item Type=Capacitor, Manufacturer Part Number=CS1608X7R221K500NRB
C122 C157 C192 C227: library part 06031C103KAT2A, "CAP CER 10000PF 100V X7R 0603", Case Code (Imperial)=0603, Case Code (Metric)=1608, Dielectric=X7R, Insulation Resistance=100GR, LCSC Part Number=C2167322, Manufacturer="Kyocera AVX", Max Operating Temperature=125°C, Min Operating Temperature=-55°C, Package Quantity=4000, Tolerance=10%, Voltage=100V, Case/Package=0603, ComponentLink1Description=https://datasheet.ciiva.com/11788/0900766b80dc2409-11788544.pdf?src-supplier=Rs, ComponentLink1URL=https://datasheet.ciiva.com/11788/0900766b80dc2409-11788544.pdf?src-supplier=Rs, ComponentLink2Description=https://datasheet.ciiva.com/1124/1679506-1124248.pdf?src-supplier=Element14, ComponentLink2URL=https://datasheet.ciiva.com/1124/1679506-1124248.pdf?src-supplier=Element14, ComponentLink3Description=https://datasheet.ciiva.com/152/cx7r-152476.pdf?src-supplier=Digikey, ComponentLink3URL=https://datasheet.ciiva.com/152/cx7r-152476.pdf?src-supplier=Digikey, ComponentLink4Description=https://datasheet.ciiva.com/2987/cx7r-2987736.pdf?src-supplier=Avnet, ComponentLink4URL=https://datasheet.ciiva.com/2987/cx7r-2987736.pdf?src-supplier=Avnet, ComponentLink5Description=https://datasheet.ciiva.com/1124/1679506-1124247.pdf?src-supplier=Element14, ComponentLink5URL=https://datasheet.ciiva.com/1124/1679506-1124247.pdf?src-supplier=Element14, ComponentLink6Description=https://datasheet.ciiva.com/7855/1679506-7855035.pdf?src-supplier=Element14, ComponentLink6URL=https://datasheet.ciiva.com/7855/1679506-7855035.pdf?src-supplier=Element14, ComponentLink7Description=https://datasheet.ciiva.com/152/cx7r-152475.pdf?src-supplier=Digikey, ComponentLink7URL=https://datasheet.ciiva.com/152/cx7r-152475.pdf?src-supplier=Digikey, ComponentLink8Description=https://datasheet.ciiva.com/152/cx7r-152477.pdf?src-supplier=Digikey, ComponentLink8URL=https://datasheet.ciiva.com/152/cx7r-152477.pdf?src-supplier=Digikey, ComponentLink9Description=https://datasheet.ciiva.com/5411/cx7r-5411278.pdf?src-supplier=Mouser, ComponentLink9URL=https://datasheet.ciiva.com/5411/cx7r-5411278.pdf?src-supplier=Mouser, ComponentLink10Description=https://datasheet.ciiva.com/14590/70001075-14590198.pdf?src-supplier=Allied+Electronics, ComponentLink10URL=https://datasheet.ciiva.com/14590/70001075-14590198.pdf?src-supplier=Allied+Electronics, Construction=Flat, Depth=0.81mm, Dissipation Factor=2.5%, Height=0.9mm, Item Type=Capacitors, Lead Free="Lead Free", Length=1.6mm, Manufacturer Part Number=06031C103KAT2A, Material=4241ConductorMaterial, Mounting Technology="Surface Mount,PCB", Packaging="Tape and Reel", Pins=2, Pricing="4000=0.05033 (USD)", Reach SVHC Compliant=No, RoHS=Yes, RoHS Compliant=Yes, Series=-, Stock=512000, Supplier=Avnet, Termination=SMD/SMT, Thickness=0.034inch, Voltage Rating=100V, Voltage Rating (AC)=100V, Voltage Rating (DC)=100V, Width=0.006inch
C123 C158 C193 C228: library part GCM1555C1H470FA16D, "CAP CER 47PF 50V C0G/NP0 0402", Case Code (Imperial)=0402, Case Code (Metric)=1005, LCSC Part Number=C393684, Manufacturer=Murata, Max Operating Temperature=125°C, Min Operating Temperature=-55°C, Ratings=AEC-Q200, Supplier Part Number 1=490-16445-1-ND, Tolerance=1%, Voltage Rating=50V, Capacitance=47pF, Case/Package=0402, Category="Ceramic Capacitors", ComponentLink1Description=http://search.murata.co.jp/Ceramy/image/img/A01X/G101/ENG/GCM1555C1H470FA16-01.pdf?src-supplier=Digi-Key, ComponentLink1URL=http://search.murata.co.jp/Ceramy/image/img/A01X/G101/ENG/GCM1555C1H470FA16-01.pdf?src-supplier=Digi-Key, Manufacturer Part Number=GCM1555C1H470FA16D, Mount="Surface Mount", Packaging="Tape and Reel", Pricing 1="1=0.11000, 10=0.07900, 50=0.04500, 100=0.03730, 500=0.02618, 1000=0.02168, 2500=0.02018, 5000=0.01846 (USD)", RoHS=No, Stock 1=27098, Supplier 1=Digi-Key
C124 C159 C194 C229: library part CC0603KRX7R9BB823, "CAP CER 0.082UF 50V X7R 0603", Case Code (Imperial)=0603, Case Code (Metric)=1608, Dielectric=X7R, LCSC Part Number=C107100, Manufacturer=Yageo, Max Operating Temperature=125°C, Min Operating Temperature=-55°C, Resistor Type=Ceramic, Supplier Part Number 1=69AH7269, Tolerance=10%, Voltage Rating=50V, Capacitance=82nF, Case/Package=0603, Category="Ceramic Capacitors", ComponentLink1Description=https://datasheet.ciiva.com/13264/upy-gphc-x7r-6-3v-to-50v-8-12304-13264057.pdf?src-supplier=Mouser, ComponentLink1URL=https://datasheet.ciiva.com/13264/upy-gphc-x7r-6-3v-to-50v-8-12304-13264057.pdf?src-supplier=Mouser, Depth=0.8mm, Halogen Free="Halogen Free", Lead Free="Lead Free", Length=1.6mm, Manufacturer Part Number=CC0603KRX7R9BB823, Mount="Surface Mount", Packaging="Tape and Reel", Pricing 1="1=0.01500, 4000=0.01400, 8000=0.01400 (USD)", Radiation Hardening=No, RoHS=Yes, RoHS Compliant=Yes, Series=CC, Stock 1=40000, Supplier 1=Newark, Termination=SMD/SMT, Thickness=0.035inch, Voltage Rating (DC)=50V, Weight=7.1E-05oz, Width=0.031inch
C125 C160 C195 C230: library part CC0603KRX7R0BB472, "CAP CER 4700PF 100V X7R 0603", Dielectric Material=4241ConductorMaterial, LCSC Part Number=C115052, Manufacturer=Yageo, Voltage Rating (AC)=100V, ComponentLink1Description=https://datasheet.ciiva.com/8033/1669968-8033781.pdf?src-supplier=Element14, ComponentLink1URL=https://datasheet.ciiva.com/8033/1669968-8033781.pdf?src-supplier=Element14, Item Type=Capacitor, Lead Free=5697LeadFree, Manufacturer Part Number=CC0603KRX7R0BB472, Pricing="1=0.1, 10=0.05, 50=0.0288, 100=0.0223, 500=0.0168, 1000=0.01319 (USD)", RoHS=Yes, Stock=67499, Supplier=Digikey
C126 C161 C196 C231: library part CC0603KPX7R9BB471, "CAP CER 470PF 50V X7R 0603", Case Code (Imperial)=0603, Case Code (Metric)=1608, Dielectric=X7R, LCSC Part Number=C2184946, Manufacturer=Yageo, Max Operating Temperature=125°C, Min Operating Temperature=-55°C, Resistor Type=Ceramic, Supplier Part Number 1=13-CC0603KPX7R9BB471CT-ND, Tolerance=10%, Voltage Rating (DC)=50V, Capacitance=470pF, Case/Package=0603, Category="Ceramic Capacitors", ComponentLink1Description=https://datasheet.ciiva.com/17436/upy-gphc-x7r-6-3v-to-50v-8-17436926.pdf?src-supplier=Avnet+Europe, ComponentLink1URL=https://datasheet.ciiva.com/17436/upy-gphc-x7r-6-3v-to-50v-8-17436926.pdf?src-supplier=Avnet+Europe, Construction=Flat, Depth=0.8mm, Halogen Free="Halogen Free", Height=0.8mm, Lead Free="Lead Free", Length=1.6mm, Manufacturer Part Number=CC0603KPX7R9BB471, Mount="Surface Mount", Packaging="Tape and Reel", Pricing 1="1=0.10000, 10=0.04700, 50=0.02560, 100=0.02100, 500=0.01498, 1000=0.01176, 2500=0.01070, 5000=0.00984 (USD)", Radiation Hardening=No, RoHS=Yes, RoHS Compliant=Yes, Stock 1=29788, Supplier 1=Digi-Key, Termination=SMD/SMT, Weight=7.1E-05oz
C127 C162 C197 C232: library part CC0603FRNPO9BN470, "CAP CER 47PF 50V NPO 0603", LCSC Part Number=C519486, Manufacturer=Yageo, ComponentLink1Description=https://datasheet.ciiva.com/5425/upy-gp-np0-16v-to-50v-8-5425545.pdf?src-supplier=Mouser, ComponentLink1URL=https://datasheet.ciiva.com/5425/upy-gp-np0-16v-to-50v-8-5425545.pdf?src-supplier=Mouser, ComponentLink2Description=https://datasheet.ciiva.com/11586/upy-gp-np0-16v-to-50v-8-11586472.pdf?src-supplier=Avnet, ComponentLink2URL=https://datasheet.ciiva.com/11586/upy-gp-np0-16v-to-50v-8-11586472.pdf?src-supplier=Avnet, Item Type=Capacitor, Manufacturer Part Number=CC0603FRNPO9BN470, Pricing="1=0.19, 10=0.126, 50=0.0756, 100=0.0594, 500=0.0439, 1000=0.03634 (USD)", RoHS=Yes, Stock=37282, Supplier=Digikey
D1 D8 D15 D22: "BRIDGE RECT 1PHASE 600V 8A GBU", LCSC Part Number=C150753, Manufacturer=Diodes, ComponentLink1Description=https://datasheet.ciiva.com/27052/1540404-27052400.pdf?src-supplier=Jameco, ComponentLink1URL=https://datasheet.ciiva.com/27052/1540404-27052400.pdf?src-supplier=Jameco, ComponentLink2Description=https://datasheet.ciiva.com/16206/ds21227-16206956.pdf?src-supplier=Future+Electronics, ComponentLink2URL=https://datasheet.ciiva.com/16206/ds21227-16206956.pdf?src-supplier=Future+Electronics, ComponentLink3Description=https://datasheet.ciiva.com/15145/getdatasheetpartid-157294-15145339.pdf?src-supplier=Verical, ComponentLink3URL=https://datasheet.ciiva.com/15145/getdatasheetpartid-157294-15145339.pdf?src-supplier=Verical, ComponentLink4Description=https://datasheet.ciiva.com/885/ds21227-885908.pdf?src-supplier=Digikey, ComponentLink4URL=https://datasheet.ciiva.com/885/ds21227-885908.pdf?src-supplier=Digikey, ComponentLink5Description=https://datasheet.ciiva.com/11195/ds21227-11195657.pdf?src-supplier=Avnet, ComponentLink5URL=https://datasheet.ciiva.com/11195/ds21227-11195657.pdf?src-supplier=Avnet, Item Type=Diode, Manufacturer Part Number=GBU806, Pricing="20=0.565, 100=0.54, 500=0.51, 1000=0.5, 3000=0.465 (USD)", RoHS=Yes, Stock=174414, Supplier="Future Electronics"
D2 D3 D9 D10 D16 D17 D23 D24: "DIODE GEN PURP 600V 1A SMA", Average Rectified Current=2A, Case/Package=SMA, Forward Voltage=1.25V, LCSC Part Number=C50432, Manufacturer="ON Semiconductor", Max Forward Surge Current (Ifsm)=30A, Max Operating Temperature=175°C, Max Repetitive Reverse Voltage (Vrrm)=600V, Max Reverse Current=5uA, Min Operating Temperature=-65°C, Output Current=1A, Package Quantity=1, ComponentLink1Description=https://datasheet.ciiva.com/8293/mura160t3-d-8293035.pdf?src-supplier=Avnet, ComponentLink1URL=https://datasheet.ciiva.com/8293/mura160t3-d-8293035.pdf?src-supplier=Avnet, ComponentLink2Description=https://datasheet.ciiva.com/27056/2015775-27056224.pdf?src-supplier=Jameco, ComponentLink2URL=https://datasheet.ciiva.com/27056/2015775-27056224.pdf?src-supplier=Jameco, ComponentLink3Description=https://datasheet.ciiva.com/16395/mura160t3-d-16395990.pdf?src-supplier=Future+Electronics, ComponentLink3URL=https://datasheet.ciiva.com/16395/mura160t3-d-16395990.pdf?src-supplier=Future+Electronics, Current Rating=2A, Forward Current=2A, Halogen Free="Halogen Free", Height=2mm, Item Type=Diode, Lead Free="Lead Free", Length=4.32mm, Manufacturer Part Number=MURA160T3G, Max Reverse Voltage (DC)=600V, Max Surge Current=30A, Packaging="Tape and Reel", Peak Non-Repetitive Surge Current=30A, Pins=2, Polarity=Standard, Pricing="5000=0.109, 10000=0.106, 15000=0.104, 20000=0.103, 25000=0.0996 (USD)", Radiation Hardening=No, Reach SVHC Compliant=No, Recovery Time=75ns, Reverse Recovery Time=75ns, Reverse Recovery Time-Max=75ns, Reverse Voltage=600V, RoHS=Yes, RoHS Compliant=Yes, Series=-, Stock=190000, Supplier="Future Electronics", Voltage Rating (DC)=600V, Width=2.6mm